# EAGLE board 315mhz_i2c_v1 (EAGLE 9.6.2)
REV: C
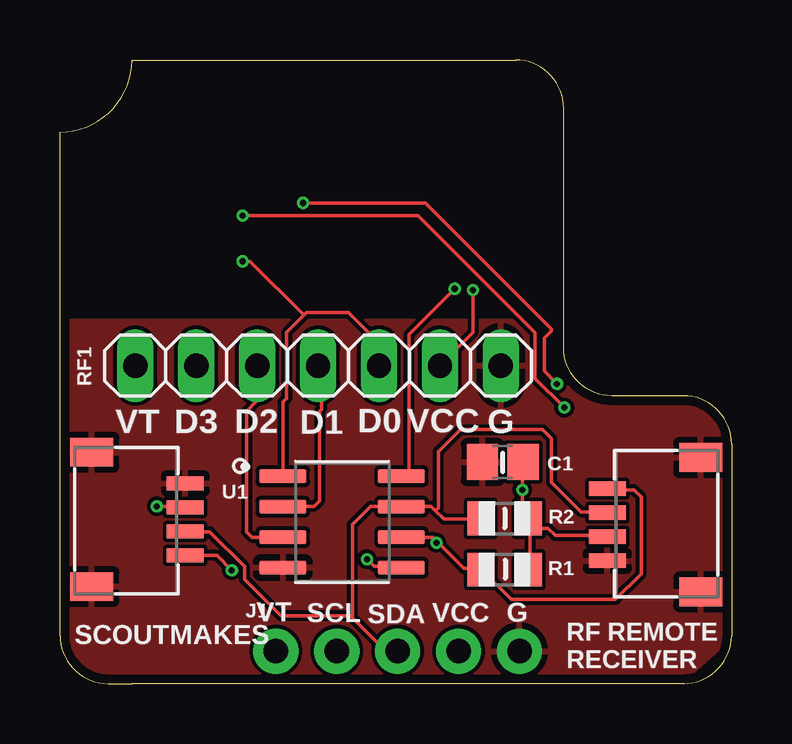
[diagram p0: board, top side]
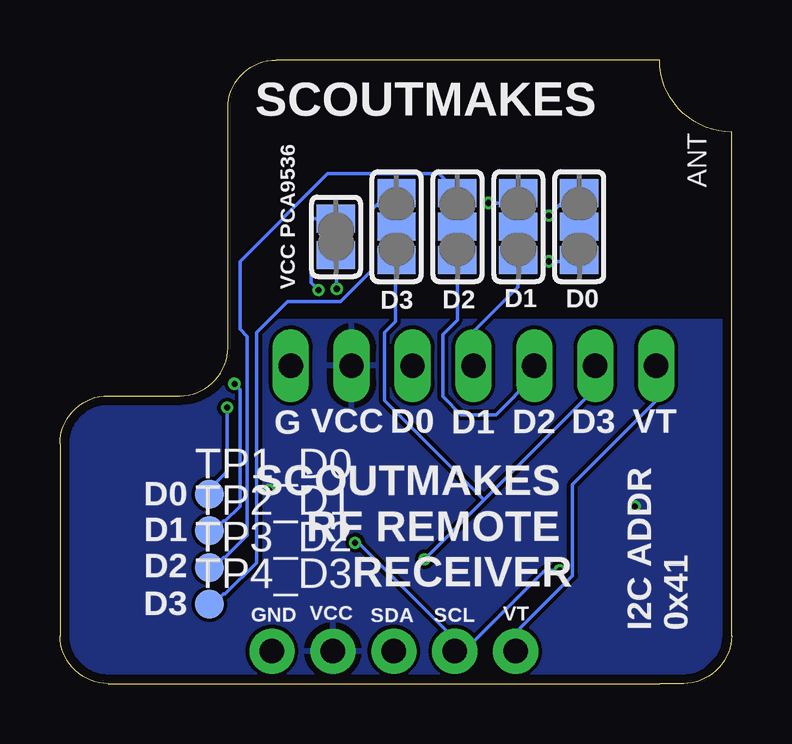
[diagram p1: board, bottom side, seen from below]

Size 28 x 26 mm. Coordinates in mm from the lower left corner, seen from the top.
Outline: 28,10 28,2 arc-90 26,0 3,0 2,0 arc-90 0,2 0,23 arc90 3,26 19,26 arc-90 21,24 21,14 arc90 23,12 26,12 arc-90 28,10
Copper layers (1*16): Top 0.035559375mm / dielectric 1.6mm / Bottom 0.035559375mm
Design rules "oshpark-2layer *": minimum track width 6mil, minimum drill 10mil, track to track 6mil, track to pad 6mil, pad to pad 6mil, via to via 6mil, smd to smd 6mil, copper to edge 15mil, drill to drill 6mil, minimum pad ring 5mil, minimum via ring 5mil, stop-mask expansion 2.5mil, vias tented up to drill 20mil, thermal gap 10mil
Net classes: 1 highpower: width 0.305 mm, drill 0.483 mm; 2 gnd: width 0.254 mm

## Footprints (pad centres in the part's own frame; a part is rotated, then mirrored left to right if it is on the bottom)
C0805 = smd 1.3 x 1.5: 1 -0.85,0; 2 0.85,0
JST_SH4 = smd 0.6 x 1.55: 1 -1.5,2.514; 2 -0.5,2.514; 3 0.5,2.514; 4 1.5,2.514 | smd 1.2 x 1.8: MT1 -2.8,-1.386; MT2 2.8,-1.386
SOLDERJUMPER_2WAY_OPEN_NOPASTE = smd 1.168 x 1.6: 1 -1.397,0; 2 0,0; 3 1.397,0
1X05_NO_SILK = drill 1.016 pad 1.88: 1 0,0; 2 2.54,0; 3 5.08,0; 4 7.62,0; 5 10.16,0
SOLDERJUMPER_CLOSEDWIRE = smd 1.168 x 1.6: 1 -0.762,0; 2 0.762,0 | smd 0.635 x 0.203: WIRE 0,0
R0805 = smd 1.1 x 1.4: 1 -1,0; 2 1,0
1X07 = drill 1.016 long: 1 -7.62,0; 2 -5.08,0; 3 -2.54,0; 4 0,0; 5 2.54,0; 6 5.08,0; 7 7.62,0
TP12R = smd 1.2 x 1.2: TP 0,0
SOIC127P599X175-8N = smd 1.97 x 0.6: 1 -2.47,1.905; 2 -2.47,0.635; 3 -2.47,-0.635; 4 -2.47,-1.905; 5 2.47,-1.905; 6 2.47,-0.635; 7 2.47,0.635; 8 2.47,1.905

## Placement (x,y rotation side)
C1  0.1uF  [C0805]  18.46,9.24 180 top
CONN3  STEMMA_I2C_QT  [JST_SH4]  2.71,6.84 270 top
CONN4  STEMMA_I2C_QT  [JST_SH4]  25.33,6.62 90 top
HP0  [SOLDERJUMPER_2WAY_OPEN_NOPASTE]  6.35,19.05 270 bottom
HP1  [SOLDERJUMPER_2WAY_OPEN_NOPASTE]  8.89,19.05 270 bottom
HP2  [SOLDERJUMPER_2WAY_OPEN_NOPASTE]  11.43,19.05 270 bottom
HP3  [SOLDERJUMPER_2WAY_OPEN_NOPASTE]  13.97,19.05 270 bottom
J1  [1X05_NO_SILK]  9,1.35 0 top
JPVCC  [SOLDERJUMPER_CLOSEDWIRE]  16.49,18.63 270 bottom
R1  10K  [R0805]  18.54,4.75 0 top
R2  10K  [R0805]  18.54,6.88 0 top
RF1  MODULE  [1X07]  10.76,13.25 0 top
TP1_D0  TPTP12R  [TP12R]  21.78,7.89 0 bottom
TP2_D1  TPTP12R  [TP12R]  21.78,6.37 0 bottom
TP3_D2  TPTP12R  [TP12R]  21.78,4.84 0 bottom
TP4_D3  TPTP12R  [TP12R]  21.78,3.32 0 bottom
U1  PCA9536D  [SOIC127P599X175-8N]  11.76,6.74 0 top

## Library data of the parts
C1 R1 R2 = adafruit
CONN3 CONN4 HP0 HP1-HP3 JPVCC = microbuilder
J1 = SparkFun-Connectors
RF1 = pinhead
TP1_D0 TP2_D1 TP3_D2 TP4_D3 = testpad
U1 = PCA9536D; AVAILABILITY: In Stock; CHECK_PRICES: https://www.snapeda.com/parts/PCA9536D/Texas+Instruments/view-part/?ref=eda; DESCRIPTION: 4-bit 2.3- to 5.5-V I2C/SMBus I/O expander with config registers; MF: Texas Instruments; MP: PCA9536D; PACKAGE: SOIC-8 Texas Instruments; PRICE: None; PURCHASE-URL: https://www.snapeda.com/api/url_track_click_mouser/?unipart_id=1110294&manufacturer=Texas Instruments&part_name=PCA9536D&search_term=None; SNAPEDA_LINK: https://www.snapeda.com/parts/PCA9536D/Texas+Instruments/view-part/?ref=snap

## Nets
D0: HP0.2 HP0.3 RF1.5 U1.1
D1: HP1.2 HP1.3 RF1.4 U1.2
D2: HP2.2 HP2.3 RF1.3 U1.3
D3: HP3.2 HP3.3 RF1.2 U1.5
GND [highpower]: C1.2 CONN3.1 CONN3.MT1 CONN3.MT2 CONN4.1 CONN4.MT1 CONN4.MT2 J1.5 RF1.7 U1.4
N$1: HP0.1 TP1_D0.TP
N$2: HP1.1 TP2_D1.TP
N$3: HP2.1 TP3_D2.TP
N$4: HP3.1 TP4_D3.TP
SCL: CONN3.4 CONN4.4 J1.2 R1.1 U1.6
SDA: CONN3.3 CONN4.3 J1.3 R2.1 U1.7
VCC: C1.1 CONN3.2 CONN4.2 J1.4 JPVCC.1 R1.2 R2.2 RF1.6
VCCPCA: JPVCC.2 U1.8
VT: J1.1 RF1.1

## Tracks (layer width: path | path; a pad name or v marks a point on that pad's centre or on a via)
D0  (via drill 0.25)
  Top 0.152: 10.17,15.35 10.29,15.47 12.04,15.47 13.26,14.25 13.26,13.26 RF1.5 | 10.17,15.35 9.45,14.63 9.45,11.89 9.3,11.73 9.3,8.69 U1.1 | v7.62,17.6 7.92,17.6 10.17,15.35
  Bottom 0.152: HP0.2 6.33,19.05 6.33,17.68 HP0.3 6.4,17.6 v7.62,17.6
D1
  Top 0.152: U1.2 10.59,7.39 10.82,7.62 10.82,11.35 10.9,11.43 10.9,13.11 10.82,13.18 RF1.4
  Bottom 0.152: HP1.2 8.91,19.05 8.91,17.68 HP1.3 8.91,17.6 8.91,16.54 10.74,14.71 10.74,13.26 RF1.4
D2
  Top 0.152: U1.3 9.22,6.1 8,6.1 7.77,6.33 7.77,11.35 8.15,11.73 8.15,13.18 RF1.3
  Bottom 0.152: HP2.2 HP2.3 11.43,15.16 12.04,14.55 12.04,11.96 11.28,11.2 9.83,11.2 8.23,12.8 8.23,13.18 RF1.3
D3  (via drill 0.25)
  Top 0.152: v12.8,5.18 13.11,4.88 14.17,4.88 U1.5
  Bottom 0.152: HP3.2 13.95,19.05 13.95,17.68 HP3.3 14.02,17.6 14.02,15.09 14.48,14.63 14.48,11.81 10.32,7.66 | 10.32,7.66 5.71,12.27 5.71,13.18 RF1.2 | 10.32,7.66 v12.8,5.18
GND
  pour Top: 25.98,0.08 1.65,0.08 0.13,1.6 0.13,15.04 0,15.16 19.71,15.16 20.75,14.12 20.75,12.93 21.79,11.89 22.35,11.89 22.43,11.81 26.39,11.81 27.58,10.62 27.66,10.62 27.66,1.55
N$1  (via drill 0.25)
  Top 0.152: v21.03,11.51 19.81,12.72 19.81,14.63 17.22,17.22 14.94,19.51 v7.62,19.51
  Bottom 0.152: v21.03,11.51 21.03,8.84 21.72,8.15 21.72,7.92 TP1_D0.TP | v7.62,19.51 6.71,20.42 6.4,20.42 HP0.1
N$2  (via drill 0.25)
  Top 0.152: v20.73,12.5 20.19,13.03 20.19,14.4 20.5,14.71 20.5,14.78 15.24,20.04 v10.13,20.04
  Bottom 0.152: v20.73,12.5 20.5,12.27 20.5,7.39 21.11,6.78 21.18,6.78 21.57,6.4 21.72,6.4 TP2_D1.TP | v10.13,20.04 9.3,20.04 HP1.1
N$3
  Bottom 0.152: TP3_D2.TP 21.72,4.88 21.57,4.88 21.18,5.26 21.11,5.26 20.19,6.17 20.19,14.48 20.5,14.78 20.5,17.6 16.84,21.26 12.19,21.26 11.43,20.5 HP2.1
N$4
  Bottom 0.152: TP4_D3.TP 21.72,3.35 21.57,3.35 21.18,3.73 21.11,3.73 19.81,5.03 19.81,14.63 18.52,15.93 16.31,15.93 15.01,17.22 15.01,19.74 14.33,20.42 14.02,20.42 HP3.1
SCL  (via drill 0.25)
  Top 0.152: 15.73,5.91 15.54,6.1 14.25,6.1 U1.6 | 15.73,5.91 16.84,4.8 17.53,4.8 R1.1 17.6,4.72 18.82,3.5 23.16,3.5 24.23,4.57 24.23,7.77 23.93,8.08 22.86,8.08 CONN4.4 | v7.16,4.72 6.55,5.33 5.26,5.33 CONN3.4 | v15.7,5.87 15.73,5.91
  Bottom 0.152: v7.16,4.72 7.77,4.72 11.12,1.37 11.51,1.37 J1.2 11.51,1.45 11.51,1.83 15.54,5.87 v15.7,5.87
SDA
  Top 0.152: 15.66,7.2 15.47,7.39 14.25,7.39 U1.7 14.17,7.39 12.95,7.39 12.19,6.63 12.19,2.82 12.15,2.78 | 15.66,7.2 16,6.86 17.53,6.86 R2.1 | 15.66,7.2 15.77,7.32 15.77,9.68 16.69,10.59 20.12,10.59 20.5,10.21 20.5,8.38 21.72,7.16 22.78,7.16 CONN4.3 | 12.15,2.78 13.56,1.37 14.02,1.37 J1.3 | 12.15,2.78 12.12,2.82 9.22,2.82 7.7,4.34 7.7,4.88 6.25,6.33 5.26,6.33 CONN3.3
VCC  (via drill 0.25)
  Top 0.152: 19.58,6.48 19.58,6.86 R2.2 | 19.58,6.48 19.58,4.8 R1.2 | C1.1 19.28,9.22 v19.28,8.08 19.28,7.16 19.51,6.93 R2.2 | 19.58,6.48 20.34,6.48 20.65,6.17 22.78,6.17 CONN4.2 | 19.58,6.48 R2.2 | v4.04,7.39 5.18,7.39 CONN3.2 | v17.22,16.41 17.22,14.63 RF1.6
  Bottom 0.152: v17.22,16.41 17.52,16.71 17.52,19.35 17.48,19.39 JPVCC.1
  pour Bottom: 1.84,0 0,1.84 0,15.15 19.76,15.15 20.63,14.28 20.63,13.45 22.45,11.63 26.72,11.63 27.94,10.41 27.94,1.27 26.67,0
VCCPCA  (via drill 0.25)
  Top 0.152: v16.46,16.46 14.55,14.55 14.55,8.91 14.25,8.61 U1.8
  Bottom 0.152: v16.46,16.46 16.46,17.83 JPVCC.2
VT
  Bottom 0.152: RF1.1 3.2,13.18 3.2,11.73 6.63,8.31 6.63,4.5 8.99,2.13 8.99,1.37 J1.1

## Text on the board
_tsilk: RF1 | VT | D3 | D2 | D1 | D0 | VCC | G | C1 | U1 | R2 | R1 | VT | SCL | SDA | VCC | G | SCOUTMAKES | RF REMOTE / RECEIVER
_bsilk: SCOUTMAKES | VCC PCA9536 | ANT | D0 | D1 | D2 | D3 | VT | D3 | D2 | D1 | D0 | D0 | VCC | G | SCOUTMAKES / RF REMOTE / RECEIVER | D0 | D1 | D2 | D3 | VT | SCL | SDA | VCC | GND | I2C ADDR / 0x41